# Altium PCB OmniCore_SDR.PcbDoc (part 11 of 13)
Units mil, origin at the board's own origin, x right, y up, seen from the top; angles counter-clockwise.
Board outline 4724.72 x 2755.91 mil, 8 copper layers (Top, GND 1, Layer 1, Layer 2, GND 2, Layer 3, Power, Bottom), stack 40.468 mil thick; 530 components, 427 nets, 2315 pads, 1715 vias.
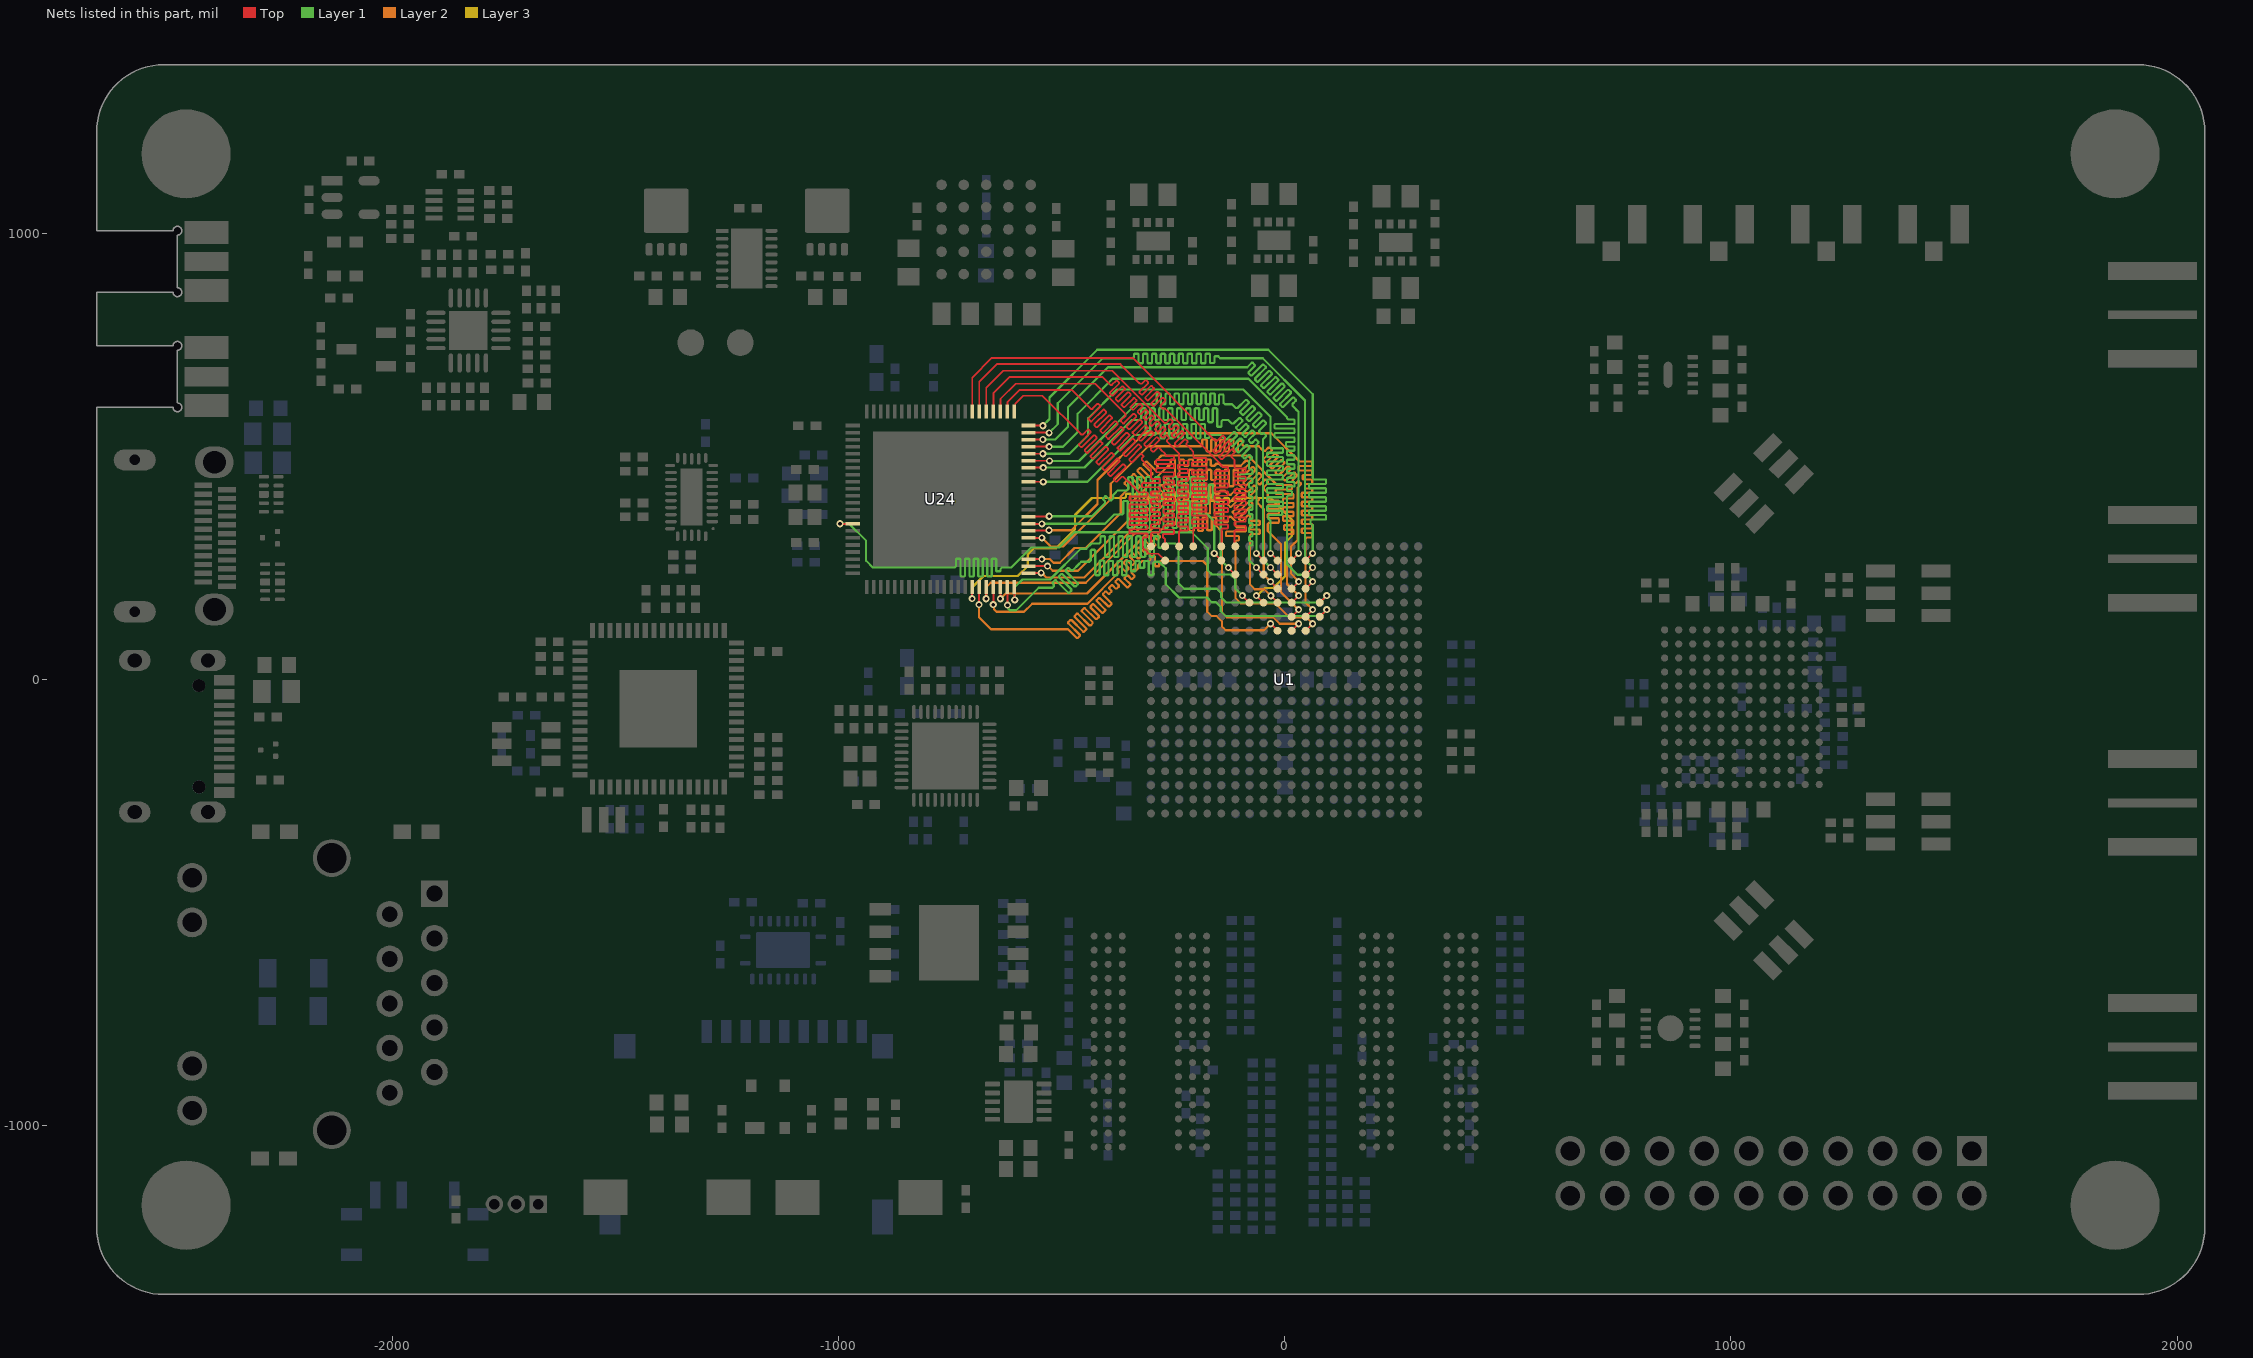
[diagram p16: the nets of this part, all layers, seen from the top]

## Via types
v1: diameter 16, hole 8, Top to Bottom, tented both sides, 1667 vias
v2: diameter 19.68, hole 7.87, Top to Bottom, 44 vias
v3: diameter 200, hole 125, Top to Bottom, 4 vias

## Nets (pads, with @x,y where several pads share a name; then routed paths per layer and width w, separated by ;. In a path a pad name is that pad's centre, name@x,y a point inside that pad or via, vN(x,y) a via of type N, cw(c..) or ccw(c..) an arc to the next point about the centre after c; other vN are vias at no path point) (continued)
UHSIF_CLK: U1.H16 U24.15 | length 1508
  Top w4.2: v1(-996.52,349.27) -996.15,348.9 U24.15@-967.9,348.9 ; v1(-94.73,188.19) U1.H16@-78.98,172.44
  Layer 1 w5: v1(-996.52,349.27) -976.27,349.27 -938,311 -938,266 -923,251 -774,251 -742,251 -739.5,251 -736.57,253.93 -736.57,269.5 -735.07,271 -728.07,271 -726.57,269.5 -726.57,232.5 -725.07,231 -718.07,231 -716.57,232.5 -716.57,269.5 -715.07,271 -708.07,271 -706.57,269.5 -706.57,232.5 -705.07,231 -698.07,231 -696.57,232.5 -696.57,269.5 -695.07,271 -688.07,271 -686.57,269.5 -686.57,232.5 -685.07,231 -678.07,231 -676.57,232.5 -676.57,269.5 -675.07,271 -668.07,271 -666.57,269.5 -666.57,232.5 -665.07,231 -658.07,231 -656.57,232.5 -656.57,269.5 -655.07,271 -648.07,271 -646.57,269.5 -646.57,244.04 -645.07,242.54 -638.07,242.54 -636.57,244.04 -636.57,248.07 -633.64,251 -622,251 -613,251 -568,296 -505,296 -471,330 -208,330 -172.22,294.22 -172.22,245.18 -162.64,235.59 -121.59,235.59 -110.59,224.59 -110.59,204.04 v1(-94.73,188.19)
UHSIF_CS#: U1.J16 U24.38 | length 1463.7
  Top w4.2: v1(-700.6,181.4) -700.4,181.6 -700.4,207 U24.38@-700.2,207.2 ; v1(-63.24,188.19) U1.J16@-47.49,172.44
  Layer 3 w5: v1(-700.6,181.4) -700.6,206.4 -675,232 -598,232 -576,254 -576,280.07 -562.01,294.07 -512.93,294.07 -470,337 -470,369 -432,407 -361,407 -358.5,407 -355.57,409.93 -355.57,415 -354.07,416.5 -347.07,416.5 -345.57,415 -345.57,401.5 -344.07,400 -337.07,400 -335.57,401.5 -335.57,415 -334.07,416.5 -327.07,416.5 -325.57,415 -325.57,401.5 -324.07,400 -317.07,400 -315.57,401.5 -315.57,415 -314.07,416.5 -307.07,416.5 -305.57,415 -305.57,401.5 -304.07,400 -297.07,400 -295.57,401.5 -295.57,415 -294.07,416.5 -287.07,416.5 -285.57,415 -285.57,401.5 -284.07,400 -277.07,400 -275.57,401.5 -275.57,415 -274.07,416.5 -267.07,416.5 -265.57,415 -265.57,401.5 -264.07,400 -257.07,400 -255.57,401.5 -255.57,415 -254.07,416.5 -247.07,416.5 -245.57,415 -245.57,401.5 -244.07,400 -237.07,400 -235.57,401.5 -235.57,415 -234.07,416.5 -227.07,416.5 -225.57,415 -225.57,401.5 -224.07,400 -217.07,400 -215.57,401.5 -215.57,415 -214.07,416.5 -207.07,416.5 -205.57,415 -205.57,401.5 -204.07,400 -197.07,400 -195.57,401.5 -195.57,415 -194.07,416.5 -187.07,416.5 -185.57,415 -185.57,401.5 -184.07,400 -177.07,400 -175.57,401.5 -175.57,415 -174.07,416.5 -167.07,416.5 -165.57,415 -165.57,401.5 -164.07,400 -157.07,400 -155.57,401.5 -155.57,405.91 -154.07,407.41 -147.07,407.41 -145.57,405.91 -145.57,401.5 -144.07,400 -137.07,400 -135.57,401.5 -135.57,405.51 -134.07,407.01 -127.07,407.01 -125.57,405.51 -125.57,401.5 -124.07,400 -117.07,400 -115.57,401.5 -115.57,405.51 -114.07,407.01 -107.07,407.01 -105.57,405.51 -105.57,402.73 -104.07,401.23 -97.07,401.23 -95.57,402.73 -95.57,404.07 -92.64,407 -41,407 -32,407 16,359 16,321.5 1,306.5 1,231.92 -25.73,205.18 -44.77,205.18 -61.76,188.19 v1(-63.24,188.19)
UHSIF_DATA0: U1.K14 U24.39 | length 1500.3
  Top w4.2: v1(-685,168) -684.7,168.3 -684.7,206.9 U24.39@-684.4,207.2 ; v1(-31.74,125.2) U1.K14@-15.99,109.45
  Layer 2 w5: v1(-685,168) -685,140 -658,113 -497,113 -485.66,113 -465.76,93.09 -463.64,93.09 -458.69,98.04 -458.69,100.16 -484.85,126.33 -484.85,128.45 -479.9,133.4 -477.78,133.4 -451.61,107.24 -449.49,107.24 -444.54,112.18 -444.54,114.31 -470.71,140.47 -470.71,142.59 -465.76,147.54 -463.64,147.54 -437.47,121.38 -435.35,121.38 -430.4,126.33 -430.4,128.45 -454.82,152.87 -454.82,154.99 -449.87,159.94 -447.75,159.94 -423.33,135.52 -421.21,135.52 -416.26,140.47 -416.26,142.59 -435.41,161.74 -435.41,163.86 -430.46,168.81 -428.34,168.81 -409.19,149.66 -407.07,149.66 -402.12,154.61 -402.12,156.73 -421.27,175.88 -421.27,178 -416.32,182.95 -414.2,182.95 -395.05,163.8 -392.92,163.8 -387.97,168.75 -387.97,170.87 -407.13,190.03 -407.13,192.15 -402.18,197.1 -400.05,197.1 -395.05,192.09 -392.92,192.09 -387.97,197.04 -387.97,199.16 -392.98,204.17 -392.98,206.29 -388.03,211.24 -385.91,211.24 -378.49,203.82 -376.37,203.82 -371.42,208.77 -371.42,210.89 -378.84,218.31 -378.84,220.43 -373.89,225.38 -371.77,225.38 -353.34,206.95 -351.22,206.95 -346.27,211.9 -346.27,214.02 -358.33,226.09 -358.33,228.21 -353.38,233.16 -351.26,233.16 -343.63,225.53 -341.51,225.53 -336.56,230.48 -336.56,232.6 -343.43,239.46 -343.43,241.59 -338.48,246.53 -336.36,246.53 -334.72,244.9 -332.6,244.9 -327.65,249.85 -327.65,251.97 -328.27,252.6 -328.27,256.74 -326.51,258.51 -319.44,265.57 -306.33,265.57 -303.83,265.57 -300.9,268.5 -300.9,275.66 -299.4,277.16 -292.4,277.16 -290.9,275.66 -290.9,255.55 -289.4,254.05 -282.4,254.05 -280.9,255.55 -280.9,262.65 -277.97,265.57 -223,265.57 -183.21,265.57 -173.47,255.83 -173.47,151.93 -163.73,142.19 -152.19,142.19 -140.73,130.73 -140.73,119.19 -132.23,110.7 -46.24,110.7 v1(-31.74,125.2)
UHSIF_DATA1: U1.K16 U24.40 | length 1500
  Top w4.2: v1(-669,181) -668.85,181.15 -668.85,207.05 U24.40@-668.7,207.2 ; v1(-31,188) -31,187.72 -15.99,172.72 U1.K16@-15.99,172.44
  Layer 2 w5: v1(-669,181) -669,207 -659,217 -446,217 -240,423 -232,423 -229.5,423 -226.57,425.93 -226.57,436.5 -225.07,438 -218.07,438 -216.57,436.5 -216.57,413.45 -215.07,411.95 -208.07,411.95 -206.57,413.45 -206.57,436.5 -205.07,438 -198.07,438 -196.57,436.5 -196.57,413.45 -195.07,411.95 -188.07,411.95 -186.57,413.45 -186.57,436.5 -185.07,438 -178.07,438 -176.57,436.5 -176.57,413.45 -175.07,411.95 -168.07,411.95 -166.57,413.45 -166.57,436.5 -165.07,438 -158.07,438 -156.57,436.5 -156.57,417.79 -155.07,416.29 -148.07,416.29 -146.57,417.79 -146.57,420.07 -143.64,423 -134,423 -131.46,420.46 -127,416 -125.23,414.23 -121.09,414.23 -107.59,427.74 -105.46,427.74 -100.51,422.79 -100.51,420.67 -127.07,394.11 -127.07,391.99 -122.12,387.04 -120,387.04 -93.44,413.59 -91.32,413.59 -86.37,408.64 -86.37,406.52 -116.52,376.37 -116.52,374.25 -111.57,369.3 -109.45,369.3 -79.3,399.45 -77.18,399.45 -72.23,394.5 -72.23,392.38 -102.42,362.19 -102.42,360.07 -97.47,355.12 -95.35,355.12 -82.81,367.66 -78.66,367.66 -78.43,367.43 -78,367 -78,364.32 -78,361.63 -78,359.13 -75.07,356.2 -57.5,356.2 -56,354.7 -56,347.7 -57.5,346.2 -76.5,346.2 -78,344.7 -78,337.7 -76.5,336.2 -57.5,336.2 -56,334.7 -56,327.7 -57.5,326.2 -75.07,326.2 -78,323.27 -78,307 -78,213.68 -67.01,202.69 -45.69,202.69 v1(-31,188)
UHSIF_DATA2: U1.L14 U24.41 | length 1499.7
  Top w4.2: v1(-653,168) v1(-653,168) -652.95,207.15 U24.41@-652.9,207.2 ; U1.L14@15.5,109.45 v1(31.25,125.2)
  Layer 2 w5: v1(-653,168) -651.54,166.54 -651.54,157.54 -646,152 -584,152 -566,170 -442,170 -374,238 -372.23,239.77 -372.23,243.91 -374.74,246.41 -374.74,248.54 -369.79,253.49 -367.67,253.49 -357.02,242.84 -354.9,242.84 -349.95,247.79 -349.95,249.91 -360.59,260.56 -360.59,262.68 -355.64,267.63 -353.52,267.63 -342.88,256.98 -340.76,256.98 -335.81,261.93 -335.81,264.05 -346.45,274.7 -346.45,276.82 -341.5,281.77 -339.38,281.77 -328.74,271.13 -326.61,271.13 -321.67,276.07 -321.67,278.2 -332.31,288.84 -332.31,290.96 -327.36,295.91 -325.24,295.91 -311.12,281.79 -309,281.79 -304.05,286.74 -304.05,288.86 -318.17,302.98 -318.17,305.1 -313.22,310.05 -311.1,310.05 -296.98,295.93 -294.85,295.93 -289.9,300.88 -289.9,303 -304.03,317.12 -304.03,319.25 -299.08,324.2 -296.95,324.2 -286.59,313.83 -284.46,313.83 -279.51,318.78 -279.51,320.9 -283.24,324.62 -283.24,328.76 -271.5,340.5 -264,348 -249,348 -246.5,348 -243.57,350.93 -243.57,361.5 -242.07,363 -235.07,363 -233.57,361.5 -233.57,334.5 -232.07,333 -225.07,333 -223.57,334.5 -223.57,361.5 -222.07,363 -215.07,363 -213.57,361.5 -213.57,334.5 -212.07,333 -205.07,333 -203.57,334.5 -203.57,361.5 -202.07,363 -195.07,363 -193.57,361.5 -193.57,334.5 -192.07,333 -185.07,333 -183.57,334.5 -183.57,361.5 -182.07,363 -175.07,363 -173.57,361.5 -173.57,336 -172.07,334.5 -165.07,334.5 -163.57,336 -163.57,361.5 -162.07,363 -155.07,363 -153.57,361.5 -153.57,344.57 -142.04,333.04 -140.73,331.73 -140.73,150.69 -129.74,139.7 -25.73,139.7 -11.23,125.2 v1(31.25,125.2)
UHSIF_DATA3: U1.M14 U24.42 | length 1499.7
  Top w4.2: U24.42@-637.2,207.2 -637.1,207.1 -637.1,181.1 v1(-637,181) ; U1.M14@47,109.45 v1(62.75,125.2)
  Layer 2 w5: v1(-637,181) -625,193 -443,193 -258,378 -252.56,378 -250.06,378 -247.13,380.93 -247.13,401.5 -245.63,403 -238.63,403 -237.13,401.5 -237.13,373.5 -235.63,372 -228.63,372 -227.13,373.5 -227.13,401.5 -225.63,403 -218.63,403 -217.13,401.5 -217.13,373.5 -215.63,372 -208.63,372 -207.13,373.5 -207.13,401.5 -205.63,403 -198.63,403 -197.13,401.5 -197.13,373.5 -195.63,372 -188.63,372 -187.13,373.5 -187.13,401.5 -185.63,403 -178.63,403 -177.13,401.5 -177.13,373.5 -175.63,372 -168.63,372 -167.13,373.5 -167.13,401.5 -165.63,403 -158.63,403 -157.13,401.5 -157.13,373.5 -155.63,372 -148.63,372 -147.13,373.5 -147.13,401.5 -145.63,403 -138.63,403 -137.13,401.5 -137.13,354.5 -135.63,353 -128.63,353 -127.13,354.5 -127.13,362.13 -124.2,365.06 -120.06,365.06 -115,360 -110.48,355.48 -110.48,347 -110.48,344.5 -107.55,341.57 -88.5,341.57 -87,340.07 -87,333.07 -88.5,331.57 -130.23,331.57 -131.73,330.07 -131.73,323.07 -130.23,321.57 -103.8,321.57 -102.3,320.07 -102.3,313.07 -103.8,311.57 -107.55,311.57 -110.48,308.64 -110.48,299.82 -110.48,183.43 -98.24,171.19 -21.19,171.19 10.3,139.7 48.25,139.7 v1(62.75,125.2)
UHSIF_DATA4: U1.N15 U24.43 | length 1508.7
  Top w4.2: U24.43@-621.4,207.2 -621.2,207 -621.2,166.87 v1(-621.24,166.83) ; U1.N15@78.5,140.94 v1(94.24,156.69)
  Layer 1 w5: v1(-621.24,166.83) -619.14,164.72 -619.14,158.35 -615.97,155.18 -601.82,155.18 -551,206 -524,206 -520.46,206 -517.53,208.93 -517.53,213.07 -519.92,215.46 -519.92,217.58 -514.97,222.53 -512.85,222.53 -485.01,194.69 -482.89,194.69 -477.94,199.64 -477.94,201.76 -505.78,229.6 -505.78,231.72 -500.83,236.67 -498.71,236.67 -470.87,208.83 -468.74,208.83 -463.8,213.78 -463.8,215.9 -491.02,243.12 -491.02,245.24 -486.07,250.19 -483.95,250.19 -478.95,245.19 -474.81,245.19 -462,258 -456,264 -440,264 -437.5,264 -434.57,266.93 -434.57,289.2 -433.07,290.7 -426.07,290.7 -424.57,289.2 -424.57,235.5 -423.07,234 -416.07,234 -414.57,235.5 -414.57,265.21 -413.07,266.71 -406.07,266.71 -404.57,265.21 -404.57,235.5 -403.07,234 -396.07,234 -394.57,235.5 -394.57,264.5 -393.07,266 -386.07,266 -384.57,264.5 -384.57,235.5 -383.07,234 -376.07,234 -374.57,235.5 -374.57,264.5 -373.07,266 -366.07,266 -364.57,264.5 -364.57,235.5 -363.07,234 -356.07,234 -354.57,235.5 -354.57,264.5 -353.07,266 -346.07,266 -344.57,264.5 -344.57,244.44 -343.07,242.94 -336.07,242.94 -334.57,244.44 -334.57,264.5 -333.07,266 -326.07,266 -324.57,264.5 -324.57,252 -323.07,250.5 -316.07,250.5 -314.57,252 -314.57,264.5 -313.07,266 -306.07,266 -304.57,264.5 -304.57,235.5 -303.07,234 -296.07,234 -294.57,235.5 -294.57,261.07 -291.64,264 -281,264 -276,259 -266.71,249.71 -266.71,213.68 -237.03,184 -174.04,184 -163.54,173.5 -154.03,173.5 -143.13,162.6 -143.13,153.09 -132.23,142.19 79.74,142.19 v1(94.24,156.69)
UHSIF_DATA5: U1.N16 U24.44 | length 1508.2
  Top w4.2: U24.44@-605.7,207.2 -605.35,206.85 -605.35,178.85 v1(-605,178.5) ; U1.N16@78.5,172.44 v1(94.24,188.19)
  Layer 1 w5: v1(-605,178.5) -605,207 -587.5,224.5 -525.73,224.5 -456.8,293.43 -444.57,293.43 -433,305 -418,305 -415.5,305 -412.57,307.93 -412.57,319.5 -411.07,321 -404.07,321 -402.57,319.5 -402.57,276.5 -401.07,275 -394.07,275 -392.57,276.5 -392.57,319.5 -391.07,321 -384.07,321 -382.57,319.5 -382.57,276.5 -381.07,275 -374.07,275 -372.57,276.5 -372.57,319.5 -371.07,321 -364.07,321 -362.57,319.5 -362.57,276.5 -361.07,275 -354.07,275 -352.57,276.5 -352.57,319.5 -351.07,321 -344.07,321 -342.57,319.5 -342.57,276.5 -341.07,275 -334.07,275 -332.57,276.5 -332.57,319.5 -331.07,321 -324.07,321 -322.57,319.5 -322.57,276.5 -321.07,275 -314.07,275 -312.57,276.5 -312.57,319.5 -311.07,321 -304.07,321 -302.57,319.5 -302.57,276.5 -301.07,275 -294.07,275 -292.57,276.5 -292.57,319.5 -291.07,321 -284.07,321 -282.57,319.5 -282.57,297.05 -281.07,295.55 -274.07,295.55 -272.57,297.05 -272.57,302.07 -269.64,305 -250,305 -246,305 -237.71,296.71 -237.71,216.18 -225,203.47 -152.5,203.47 -142.37,193.34 -142.37,183.82 -131.56,173.02 79.07,173.02 v1(94.24,188.19)
UHSIF_DATA6: U1.K17 U24.45 | length 1499.7
  Top w4.2: U24.45@-574.2,238.6 -574,238.8 -546.2,238.8 v1(-546,239) ; v1(-31.74,219.68) U1.K17@-15.99,203.94
  Layer 2 w5: v1(-546,239) -544.08,239 -534.08,229 -449,229 -326,352 -324.23,353.77 -324.23,357.91 -337.91,371.59 -337.91,373.71 -332.96,378.66 -330.84,378.66 -315.01,362.83 -312.89,362.83 -307.94,367.78 -307.94,369.91 -324.64,386.6 -324.64,388.72 -319.69,393.67 -317.56,393.67 -300.87,376.98 -298.75,376.98 -293.8,381.93 -293.8,384.05 -310.49,400.74 -310.49,402.86 -305.54,407.81 -303.42,407.81 -286.73,391.12 -284.61,391.12 -279.66,396.07 -279.66,398.19 -296.35,414.88 -296.35,417 -291.4,421.95 -289.28,421.95 -272.59,405.26 -270.47,405.26 -265.52,410.21 -265.52,412.33 -282.21,429.02 -282.21,431.15 -277.26,436.1 -275.14,436.1 -258.45,419.4 -256.32,419.4 -251.37,424.35 -251.37,426.47 -268.07,443.17 -268.07,445.29 -263.12,450.24 -261,450.24 -246.45,435.69 -242.31,435.69 -240,438 -231,447 -220,447 -217.5,447 -214.57,449.93 -214.57,468.5 -213.07,470 -206.07,470 -204.57,468.5 -204.57,448.5 -203.07,447 -196.07,447 -194.57,448.5 -194.57,468.5 -193.07,470 -186.07,470 -184.57,468.5 -184.57,448.5 -183.07,447 -176.07,447 -174.57,448.5 -174.57,468.5 -173.07,470 -166.07,470 -164.57,468.5 -164.57,448.5 -163.07,447 -156.07,447 -154.57,448.5 -154.57,468.5 -153.07,470 -146.07,470 -144.57,468.5 -144.57,433.5 -143.07,432 -136.07,432 -134.57,433.5 -134.57,468.5 -133.07,470 -126.07,470 -124.57,468.5 -124.57,434.98 -123.07,433.48 -116.07,433.48 -114.57,434.98 -114.57,468.5 -113.07,470 -106.07,470 -104.57,468.5 -104.57,439.57 -88,423 -86.23,421.23 -82.09,421.23 -69.09,434.24 -66.96,434.24 -62.01,429.29 -62.01,427.17 -76.03,413.15 -76.03,411.03 -71.08,406.08 -68.96,406.08 -65.43,409.61 -63.31,409.61 -58.36,404.66 -58.36,402.53 -60.88,400.02 -60.88,395.88 -54.77,389.77 -53,388 -47,382 -47,234.94 v1(-31.74,219.68)
UHSIF_DATA7: U1.L15 U24.46 | length 1499.7
  Top w4.2: U24.46@-574.2,254.4 v1@-531.5,254.37 ; U1.L15@15.5,140.98 v1(31.22,156.73)
  Layer 2 w5: v1(-531.48,254.35) -530.25,254.35 -519.9,244 -463,244 -347.97,359.03 -347.97,392.03 -261,479 -258.5,479 -255.57,481.93 -255.57,491.5 -254.07,493 -247.07,493 -245.57,491.5 -245.57,456.25 -244.07,454.75 -237.07,454.75 -235.57,456.25 -235.57,491.5 -234.07,493 -227.07,493 -225.57,491.5 -225.57,480.15 -224.07,478.65 -217.07,478.65 -215.57,480.15 -215.57,491.5 -214.07,493 -207.07,493 -205.57,491.5 -205.57,480.49 -204.07,478.99 -197.07,478.99 -195.57,480.49 -195.57,491.5 -194.07,493 -187.07,493 -185.57,491.5 -185.57,480.49 -184.07,478.99 -177.07,478.99 -175.57,480.49 -175.57,491.5 -174.07,493 -167.07,493 -165.57,491.5 -165.57,480.49 -164.07,478.99 -157.07,478.99 -155.57,480.49 -155.57,482.24 -154.07,483.74 -147.07,483.74 -145.57,482.24 -145.57,481.93 -142.64,479 -129.9,479 -106,479 -98.32,479 -86.59,490.74 -84.46,490.74 -79.51,485.79 -79.51,483.66 -94.51,468.67 -94.51,466.55 -89.56,461.6 -87.44,461.6 -72.44,476.59 -70.32,476.59 -65.37,471.64 -65.37,469.52 -92.52,442.37 -92.52,440.25 -87.57,435.3 -85.45,435.3 -58.3,462.45 -56.18,462.45 -51.23,457.5 -51.23,455.38 -62.24,444.37 -62.24,442.24 -57.3,437.3 -55.17,437.3 -44.16,448.31 -42.04,448.31 -37.09,443.36 -37.09,441.24 -47.09,431.23 -47.09,427.09 -45.27,425.27 -43.5,423.5 -38,418 -38,407 -38,404.5 -35.07,401.57 -14.5,401.57 -13,400.07 -13,393.07 -14.5,391.57 -36.5,391.57 -38,390.07 -38,383.07 -36.5,381.57 -14.5,381.57 -13,380.07 -13,373.07 -14.5,371.57 -36.5,371.57 -38,370.07 -38,363.07 -36.5,361.57 -14.5,361.57 -13,360.07 -13,353.07 -14.5,351.57 -35.07,351.57 -38,348.64 -38,342.78 -38,333 -8,303 -8,195.94 v1(31.22,156.73)
UHSIF_DATA8: U1.L16 U24.47 | length 1499.7
  Top w4.2: U24.47@-574.2,270.1 -574.12,270.02 -544.08,270.02 v1(-544,269.94) ; U1.L16@15.5,172.44 v1(31.25,188.19)
  Layer 2 w5: v1(-544,269.94) -525.98,269.94 -518.04,262 -504,262 -471,295 -446,295 -367.5,373.5 -367.5,410.5 -352.5,425.5 -350.73,427.27 -350.73,431.41 -358.21,438.88 -358.21,441.01 -353.26,445.96 -351.14,445.96 -332.04,426.86 -329.92,426.86 -324.97,431.81 -324.97,433.94 -344.06,453.03 -344.06,455.15 -339.11,460.1 -336.99,460.1 -317.9,441.01 -315.78,441.01 -310.83,445.96 -310.83,448.08 -329.92,467.17 -329.92,469.29 -324.97,474.24 -322.85,474.24 -303.76,455.15 -301.64,455.15 -296.69,460.1 -296.69,462.22 -315.78,481.31 -315.78,483.43 -310.83,488.38 -308.71,488.38 -290.77,470.44 -288.65,470.44 -283.7,475.39 -283.7,477.51 -290.02,483.84 -290.02,487.98 -285.5,492.5 -276,502 -83,502 -19.5,438.5 -17,436 14.77,436 16.27,434.5 16.27,427.5 14.77,426 -18.5,426 -20,424.5 -20,417.5 -18.5,416 18.5,416 20,414.5 20,407.5 18.5,406 -2.5,406 -4,404.5 -4,397.5 -2.5,396 18.5,396 20,394.5 20,387.5 18.5,386 -2.5,386 -4,384.5 -4,377.5 -2.5,376 18.5,376 20,374.5 20,367.5 18.5,366 -2.5,366 -4,364.5 -4,357.5 -2.5,356 18.5,356 20,354.5 20,347.5 18.5,346 0,346 -1.5,344.5 -1.5,337.5 0,336 18.5,336 20,334.5 20,327.5 18.5,326 7.93,326 5,323.07 5,314.22 5,214.44 v1(31.25,188.19)
UHSIF_DATA9: U1.L17 U24.50 | length 1499.7
  Top w4.2: U24.50@-574.2,317.4 -574.1,317.5 -544.1,317.5 v1(-544,317.6) ; U1.L17@15.5,203.94 v1(31.25,219.68)
  Layer 2 w5: v1(-544,317.6) -524.9,298.5 -495.5,298.5 -390,404 -390,439 -306,523 -190,523 -187.5,523 -184.57,525.93 -184.57,536.5 -183.07,538 -176.07,538 -174.57,536.5 -174.57,512.5 -173.07,511 -166.07,511 -164.57,512.5 -164.57,536.5 -163.07,538 -156.07,538 -154.57,536.5 -154.57,512.5 -153.07,511 -146.07,511 -144.57,512.5 -144.57,536.5 -143.07,538 -136.07,538 -134.57,536.5 -134.57,512.5 -133.07,511 -126.07,511 -124.57,512.5 -124.57,536.5 -123.07,538 -116.07,538 -114.57,536.5 -114.57,512.5 -113.07,511 -106.07,511 -104.57,512.5 -104.57,533.99 -103.07,535.49 -96.07,535.49 -94.57,533.99 -94.57,525.93 -91.64,523 -67,523 -58,523 -49.5,514.5 -47.73,512.73 -43.59,512.73 -36.11,520.21 -33.99,520.21 -29.04,515.26 -29.04,513.14 -48.14,494.04 -48.14,491.92 -43.19,486.97 -41.06,486.97 -21.97,506.06 -19.85,506.06 -14.9,501.11 -14.9,498.99 -33.99,479.9 -33.99,477.78 -29.04,472.83 -26.92,472.83 -7.83,491.92 -5.71,491.92 -0.76,486.97 -0.76,484.85 -19.85,465.76 -19.85,463.64 -14.9,458.69 -12.78,458.69 6.31,477.78 8.43,477.78 13.38,472.83 13.38,470.71 -4.2,453.13 -4.2,451.01 0.75,446.06 2.88,446.06 20.45,463.64 22.58,463.64 27.52,458.69 27.52,456.57 18.29,447.33 18.29,445.21 23.24,440.26 25.36,440.26 29.62,444.52 31.74,444.52 36.69,439.57 36.69,437.45 29,429.76 29,424 29,313 14,298 14,236.94 v1(31.25,219.68)
UHSIF_DATA10: U1.M15 U24.51 | length 1500
  Top w4.2: U24.51@-574.2,333.1 -573.38,333.92 -528.92,333.92 v1(-528.1,334.73) ; U1.M15@47,140.94 v1(62.75,156.69)
  Layer 2 w5: v1(-528.1,334.73) -478.27,334.73 -419.5,393.5 -419.5,447.5 -315,552 -30,552 31,491 33.5,488.5 60.25,488.5 61.75,487 61.75,480 60.25,478.5 33.25,478.5 31.75,477 31.75,470 33.25,468.5 60.25,468.5 61.75,467 61.75,460 60.25,458.5 41.99,458.5 40.49,457 40.49,450 41.99,448.5 60.25,448.5 61.75,447 61.75,440 60.25,438.5 47.19,438.5 45.69,437 45.69,430 47.19,428.5 60.25,428.5 61.75,427 61.75,420 60.25,418.5 39.5,418.5 38,417 38,410 39.5,408.5 60.25,408.5 61.75,407 61.75,400 60.25,398.5 39.5,398.5 38,397 38,390 39.5,388.5 60.25,388.5 61.75,387 61.75,380 60.25,378.5 39.5,378.5 38,377 38,370 39.5,368.5 60.25,368.5 61.75,367 61.75,360 60.25,358.5 39.5,358.5 38,357 38,350 39.5,348.5 60.25,348.5 61.75,347 61.75,340 60.25,338.5 39.5,338.5 38,337 38,330 39.5,328.5 59.83,328.5 61.33,327 61.33,320 59.83,318.5 49.68,318.5 46.75,315.57 46.75,301 46.75,172.69 v1(62.75,156.69)
UHSIF_DATA11: U1.F19 U24.52 | length 1508.1
  Top w4.2: U24.52@-574.2,348.9 -574.15,348.95 v1(-544,349) v1(-544,349) ; v1(-157.72,282.68) U1.F19@-141.98,266.93
  Layer 1 w5: v1(-544,349) -543.77,349.23 -522,349.23 -402.77,349.23 -396.57,355.43 -382,370 -367,370 -364.5,370 -361.57,372.93 -361.57,398.5 -360.07,400 -353.07,400 -351.57,398.5 -351.57,341.5 -350.07,340 -343.07,340 -341.57,341.5 -341.57,398.5 -340.07,400 -333.07,400 -331.57,398.5 -331.57,341.5 -330.07,340 -323.07,340 -321.57,341.5 -321.57,398.5 -320.07,400 -313.07,400 -311.57,398.5 -311.57,341.5 -310.07,340 -303.07,340 -301.57,341.5 -301.57,398.5 -300.07,400 -293.07,400 -291.57,398.5 -291.57,341.5 -290.07,340 -283.07,340 -281.57,341.5 -281.57,398.5 -280.07,400 -273.07,400 -271.57,398.5 -271.57,341.5 -270.07,340 -263.07,340 -261.57,341.5 -261.57,398.5 -260.07,400 -253.07,400 -251.57,398.5 -251.57,341.5 -250.07,340 -243.07,340 -241.57,341.5 -241.57,398.5 -240.07,400 -233.07,400 -231.57,398.5 -231.57,341.5 -230.07,340 -223.07,340 -221.57,341.5 -221.57,398.5 -220.07,400 -213.07,400 -211.57,398.5 -211.57,341.5 -210.07,340 -203.07,340 -201.57,341.5 -201.57,396.25 -200.07,397.75 -193.07,397.75 -191.57,396.25 -191.57,372.93 -188.64,370 -173,370 -158,355 -158,282.95 v1(-157.72,282.68)
UHSIF_DATA12: U1.G18 U24.53 | length 1508.3
  Top w4.2: U24.53@-574.2,364.6 -573.5,365.3 -528.7,365.3 v1(-528,366) ; v1(-126.23,251.07) v1(-126.23,251.07) U1.G18@-110.48,235.43 U1.G18@-110.48,235.43
  Layer 1 w5: v1(-528,366) -432,366 -404.5,393.5 -402.73,395.27 -402.73,399.41 -407.24,403.91 -407.24,406.04 -402.29,410.99 -400.17,410.99 -390.77,401.59 -388.65,401.59 -383.7,406.54 -383.7,408.66 -384.45,409.41 -384.45,413.55 -381,417 -374,424 -356,424 -353.5,424 -350.57,426.93 -350.57,452.5 -349.07,454 -342.07,454 -340.57,452.5 -340.57,410.5 -339.07,409 -332.07,409 -330.57,410.5 -330.57,452.5 -329.07,454 -322.07,454 -320.57,452.5 -320.57,410.5 -319.07,409 -312.07,409 -310.57,410.5 -310.57,452.5 -309.07,454 -302.07,454 -300.57,452.5 -300.57,410.5 -299.07,409 -292.07,409 -290.57,410.5 -290.57,452.5 -289.07,454 -282.07,454 -280.57,452.5 -280.57,410.5 -279.07,409 -272.07,409 -270.57,410.5 -270.57,452.5 -269.07,454 -262.07,454 -260.57,452.5 -260.57,410.5 -259.07,409 -252.07,409 -250.57,410.5 -250.57,452.5 -249.07,454 -242.07,454 -240.57,452.5 -240.57,410.5 -239.07,409 -232.07,409 -230.57,410.5 -230.57,452.5 -229.07,454 -222.07,454 -220.57,452.5 -220.57,410.5 -219.07,409 -212.07,409 -210.57,410.5 -210.57,452.5 -209.07,454 -202.07,454 -200.57,452.5 -200.57,408.25 -199.07,406.75 -192.07,406.75 -190.57,408.25 -190.57,452.5 -189.07,454 -182.07,454 -180.57,452.5 -180.57,395.5 -179.07,394 -172.07,394 -170.57,395.5 -170.57,435.34 -169.07,436.84 -162.07,436.84 -160.57,435.34 -160.57,407.57 -144.8,391.8 -143.22,390.22 -143.22,268.18 -126.23,251.18 v1(-126.23,251.07)
UHSIF_DATA13: U1.J18 U24.58 | length 1508.1
  Top w4.2: U24.58@-574.2,443.4 -574.07,443.28 -541.12,443.28 v1(-541,443.15) ; v1(-63.5,251.18) -63.37,251.18 -47.62,235.43 U1.J18@-47.49,235.43
  Layer 1 w5: v1(-541,443.15) -441.85,443.15 -337,548 -294,548 -291.5,548 -288.57,550.93 -288.57,571.5 -287.07,573 -280.07,573 -278.57,571.5 -278.57,542.5 -277.07,541 -270.07,541 -268.57,542.5 -268.57,571.5 -267.07,573 -260.07,573 -258.57,571.5 -258.57,542.5 -257.07,541 -250.07,541 -248.57,542.5 -248.57,571.5 -247.07,573 -240.07,573 -238.57,571.5 -238.57,542.5 -237.07,541 -230.07,541 -228.57,542.5 -228.57,571.5 -227.07,573 -220.07,573 -218.57,571.5 -218.57,542.5 -217.07,541 -210.07,541 -208.57,542.5 -208.57,571.5 -207.07,573 -200.07,573 -198.57,571.5 -198.57,542.05 -197.07,540.55 -190.07,540.55 -188.57,542.05 -188.57,571.5 -187.07,573 -180.07,573 -178.57,571.5 -178.57,542.75 -177.07,541.25 -170.07,541.25 -168.57,542.75 -168.57,545.07 -165.64,548 -155,548 -143,548 -135.5,540.5 -133.73,538.73 -129.59,538.73 -114.09,554.24 -111.96,554.24 -107.01,549.29 -107.01,547.17 -123.53,530.65 -123.53,528.53 -118.58,523.58 -116.46,523.58 -99.94,540.09 -97.82,540.09 -92.87,535.14 -92.87,533.02 -109.39,516.51 -109.39,514.39 -104.44,509.44 -102.32,509.44 -85.8,525.95 -83.68,525.95 -78.73,521 -78.73,518.88 -95.24,502.37 -95.24,500.24 -90.3,495.3 -88.17,495.3 -80.37,503.1 -78.25,503.1 -73.3,498.15 -73.3,496.03 -80.23,489.09 -80.23,480.62 -80.23,476 -80.23,473.5 -77.3,470.57 -73.74,470.57 -72.24,469.07 -72.24,462.07 -73.74,460.57 -98.73,460.57 -100.23,459.07 -100.23,452.07 -98.73,450.57 -73.74,450.57 -72.24,449.07 -72.24,442.07 -73.74,440.57 -78.73,440.57 -80.23,439.07 -80.23,432.07 -78.73,430.57 -73.74,430.57 -72.24,429.07 -72.24,422.07 -73.74,420.57 -78.73,420.57 -80.23,419.07 -80.23,412.07 -78.73,410.57 -73.74,410.57 -72.24,409.07 -72.24,402.07 -73.74,400.57 -78.73,400.57 -80.23,399.07 -80.23,392.07 -78.73,390.57 -73.74,390.57 -72.24,389.07 -72.24,382.07 -73.74,380.57 -78.73,380.57 -80.23,379.07 -80.23,372.07 -78.73,370.57 -73.74,370.57 -72.24,369.07 -72.24,362.07 -73.74,360.57 -78.73,360.57 -80.23,359.07 -80.23,352.07 -78.73,350.57 -73.74,350.57 -72.24,349.07 -72.24,342.07 -73.74,340.57 -78.73,340.57 -80.23,339.07 -80.23,332.07 -78.73,330.57 -73.74,330.57 -72.24,329.07 -72.24,322.07 -73.74,320.57 -78.73,320.57 -80.23,319.07 -80.23,312.07 -78.73,310.57 -73.74,310.57 -72.24,309.07 -72.24,302.07 -73.74,300.57 -77.3,300.57 -80.23,297.64 -80.23,289 -80.23,268.18 -63.5,251.44 v1(-63.5,251.18)
UHSIF_DATA14: U1.J19 U24.60 | length 1508.1
  Top w4.2: U24.60@-574.2,474.9 -574.07,475.03 -541.12,475.03 v1(-541,475.15) ; v1(-63.5,282.68) -63.37,282.68 -47.62,266.93 U1.J19@-47.49,266.93
  Layer 1 w5: v1(-541,475.15) -448.85,475.15 -342,582 -326.75,582 -324.25,582 -321.32,584.93 -321.32,606.5 -319.82,608 -312.82,608 -311.32,606.5 -311.32,558.5 -309.82,557 -302.82,557 -301.32,558.5 -301.32,606.5 -299.82,608 -292.82,608 -291.32,606.5 -291.32,583.5 -289.82,582 -282.82,582 -281.32,583.5 -281.32,606.5 -279.82,608 -272.82,608 -271.32,606.5 -271.32,583.5 -269.82,582 -262.82,582 -261.32,583.5 -261.32,606.5 -259.82,608 -252.82,608 -251.32,606.5 -251.32,583.5 -249.82,582 -242.82,582 -241.32,583.5 -241.32,606.5 -239.82,608 -232.82,608 -231.32,606.5 -231.32,583.5 -229.82,582 -222.82,582 -221.32,583.5 -221.32,606.5 -219.82,608 -212.82,608 -211.32,606.5 -211.32,583.5 -209.82,582 -202.82,582 -201.32,583.5 -201.32,606.5 -199.82,608 -192.82,608 -191.32,606.5 -191.32,583.5 -189.82,582 -182.82,582 -181.32,583.5 -181.32,606.5 -179.82,608 -172.82,608 -171.32,606.5 -171.32,578.33 -169.82,576.83 -162.82,576.83 -161.32,578.33 -161.32,606.5 -159.82,608 -152.82,608 -151.32,606.5 -151.32,567.85 -149.82,566.35 -142.82,566.35 -141.32,567.85 -141.32,579.07 -138.39,582 -127,582 -120.5,575.5 -118.73,573.73 -114.59,573.73 -102.09,586.24 -99.96,586.24 -95.01,581.29 -95.01,579.17 -108.53,565.65 -108.53,563.53 -103.58,558.58 -101.46,558.58 -87.94,572.09 -85.82,572.09 -80.87,567.14 -80.87,565.02 -94.39,551.51 -94.39,549.39 -89.44,544.44 -87.32,544.44 -73.8,557.95 -71.68,557.95 -66.73,553 -66.73,550.88 -80.24,537.37 -80.24,535.24 -75.3,530.29 -73.17,530.29 -65.87,537.6 -63.75,537.6 -58.8,532.65 -58.8,530.53 -65.09,524.23 -65.09,520.09 -63.24,518.24 -63.24,514.37 -63.24,282.94 v1(-63.5,282.68)
UHSIF_DATA15: U1.K18 U24.61 | length 1508.5
  Top w4.2: U24.61@-574.2,490.6 -573.9,490.3 -527.3,490.3 v1(-527,490) ; v1(-31.74,251.18) U1.K18@-15.99,235.43
  Layer 1 w5: v1(-527,490) -461,490 -334,617 -292.35,617 -289.85,617 -286.92,619.93 -286.92,639.5 -285.42,641 -278.42,641 -276.92,639.5 -276.92,618.5 -275.42,617 -268.42,617 -266.92,618.5 -266.92,639.5 -265.42,641 -258.42,641 -256.92,639.5 -256.92,618.5 -255.42,617 -248.42,617 -246.92,618.5 -246.92,639.5 -245.42,641 -238.42,641 -236.92,639.5 -236.92,618.5 -235.42,617 -228.42,617 -226.92,618.5 -226.92,639.5 -225.42,641 -218.42,641 -216.92,639.5 -216.92,618.5 -215.42,617 -208.42,617 -206.92,618.5 -206.92,639.5 -205.42,641 -198.42,641 -196.92,639.5 -196.92,618.5 -195.42,617 -188.42,617 -186.92,618.5 -186.92,639.5 -185.42,641 -178.42,641 -176.92,639.5 -176.92,618.5 -175.42,617 -168.42,617 -166.92,618.5 -166.92,639.5 -165.42,641 -158.42,641 -156.92,639.5 -156.92,618.5 -155.42,617 -148.42,617 -146.92,618.5 -146.92,637.18 -145.42,638.68 -138.42,638.68 -136.92,637.18 -136.92,619.93 -133.99,617 -127,617 -118,617 -111.5,610.5 -109.73,608.73 -105.59,608.73 -87.51,626.81 -85.39,626.81 -80.44,621.86 -80.44,619.74 -99.53,600.65 -99.53,598.53 -94.58,593.58 -92.46,593.58 -73.37,612.67 -71.24,612.67 -66.3,607.72 -66.3,605.6 -85.39,586.51 -85.39,584.39 -80.44,579.44 -78.32,579.44 -59.22,598.53 -57.1,598.53 -52.15,593.58 -52.15,591.46 -71.24,572.37 -71.24,570.24 -66.3,565.29 -64.17,565.29 -48.87,580.6 -46.75,580.6 -41.8,575.65 -41.8,573.53 -57.5,557.83 -57.5,555.71 -52.55,550.76 -50.42,550.76 -48.87,552.31 -46.75,552.31 -41.8,547.36 -41.8,545.24 -48.74,538.31 -48.74,528.28 -48.74,525.78 -48.74,268.18 v1(-31.74,251.18)
UHSIF_DATA16: U1.K19 U24.62 | length 1508.1
  Top w4.2: U24.62@-574.2,506.4 -574,506.2 -542.2,506.2 v1(-542,506) ; v1(-31.74,282.68) U1.K19@-15.99,266.93
  Layer 1 w5: v1(-542,506) -482,506 -440.5,547.5 -440.5,585.5 -376,650 -93,650 -31.74,588.74 -31.74,524 -31.74,521.5 -28.81,518.57 -5.5,518.57 -4,517.07 -4,510.07 -5.5,508.57 -38.24,508.57 -39.74,507.07 -39.74,500.07 -38.24,498.57 -5.5,498.57 -4,497.07 -4,490.07 -5.5,488.57 -38.24,488.57 -39.74,487.07 -39.74,480.07 -38.24,478.57 -5.5,478.57 -4,477.07 -4,470.07 -5.5,468.57 -38.24,468.57 -39.74,467.07 -39.74,460.07 -38.24,458.57 -5.5,458.57 -4,457.07 -4,450.07 -5.5,448.57 -38.24,448.57 -39.74,447.07 -39.74,440.07 -38.24,438.57 -5.5,438.57 -4,437.07 -4,430.07 -5.5,428.57 -38.24,428.57 -39.74,427.07 -39.74,420.07 -38.24,418.57 -5.5,418.57 -4,417.07 -4,410.07 -5.5,408.57 -38.24,408.57 -39.74,407.07 -39.74,400.07 -38.24,398.57 -5.5,398.57 -4,397.07 -4,390.07 -5.5,388.57 -38.24,388.57 -39.74,387.07 -39.74,380.07 -38.24,378.57 -7.11,378.57 -5.61,377.07 -5.61,370.07 -7.11,368.57 -34.67,368.57 -36.17,367.07 -36.17,360.07 -34.67,358.57 -31.74,355.64 -31.74,352 v1(-31.74,282.68)
UHSIF_DATA17: U1.M17 U24.63 | length 1508.1
  Top w4.2: U24.63@-574.2,522.1 -574.15,522.05 v1(-528,522) v1(-528,522) ; U1.M17@47,203.94 v1(62.75,219.68)
  Layer 1 w5: v1(-528,522) -497,522 -464.02,554.98 -464.02,595.98 -386,674 -81,674 5,588 5,585.5 7.93,582.57 20.75,582.57 22.25,581.07 22.25,574.07 20.75,572.57 -21.24,572.57 -22.74,571.07 -22.74,564.07 -21.24,562.57 20.75,562.57 22.25,561.07 22.25,554.07 20.75,552.57 -21.24,552.57 -22.74,551.07 -22.74,544.07 -21.24,542.57 20.75,542.57 22.25,541.07 22.25,534.07 20.75,532.57 4.62,532.57 3.12,531.07 3.12,524.07 4.62,522.57 20.75,522.57 22.25,521.07 22.25,514.07 20.75,512.57 6.5,512.57 5,511.07 5,504.07 6.5,502.57 20.75,502.57 22.25,501.07 22.25,494.07 20.75,492.57 6.5,492.57 5,491.07 5,484.07 6.5,482.57 20.75,482.57 22.25,481.07 22.25,474.07 20.75,472.57 6.5,472.57 5,471.07 5,464.07 6.5,462.57 20.75,462.57 22.25,461.07 22.25,454.07 20.75,452.57 6.5,452.57 5,451.07 5,444.07 6.5,442.57 20.75,442.57 22.25,441.07 22.25,434.07 20.75,432.57 6.5,432.57 5,431.07 5,424.07 6.5,422.57 14.76,422.57 16.26,421.07 16.26,414.07 14.76,412.57 7.93,412.57 5,409.64 5,399.75 5,258.93 28.93,235 49,235 62.75,221.25 v1(62.75,219.68)
UHSIF_DATA18: U1.L19 U24.64 | length 1508.1
  Top w4.2: U24.64@-574.2,537.9 -574.15,537.95 v1(-542,538) v1(-542,538) ; U1.L19@15.5,266.93 v1(31.25,282.68)
  Layer 1 w5: v1(-542,538) -514,538 -485.5,566.5 -485.5,610.5 -396,700 -87.32,700 -83.79,700 -73.85,709.94 -71.72,709.94 -66.77,704.99 -66.77,702.87 -80.9,688.74 -80.9,686.62 -75.95,681.67 -73.83,681.67 -49.68,705.83 -47.55,705.83 -42.6,700.88 -42.6,698.75 -66.75,674.6 -66.75,672.48 -61.81,667.53 -59.68,667.53 -35.53,691.68 -33.41,691.68 -28.46,686.73 -28.46,684.61 -52.61,660.46 -52.61,658.34 -47.66,653.39 -45.54,653.39 -21.39,677.54 -19.27,677.54 -14.32,672.59 -14.32,670.47 -38.47,646.32 -38.47,644.2 -33.52,639.25 -31.4,639.25 -7.25,663.4 -5.13,663.4 -0.18,658.45 -0.18,656.33 -24.33,632.18 -24.33,630.06 -19.38,625.11 -17.26,625.11 6.89,649.26 9.01,649.26 13.96,644.31 13.96,642.19 -10.19,618.04 -10.19,615.91 -5.24,610.96 -3.12,610.96 17.92,632 20.04,632 24.99,627.05 24.99,624.93 17.6,617.54 17.6,613.4 23.73,607.27 25.5,605.5 31.25,599.75 v1(31.25,282.68)
UHSIF_DATA19: U1.M18 U24.65 | length 1508.2
  Top w4.2: U24.65@-574.2,553.6 -573.9,553.3 -528.3,553.3 v1(-528,553) ; U1.M18@47,235.43 v1(62.75,251.18)
  Layer 1 w5: v1(-528,553) -508.5,572.5 -508.5,619.5 -408,720 -343,720 -340.5,720 -337.57,722.93 -337.57,728.5 -336.07,730 -329.07,730 -327.57,728.5 -327.57,710.5 -326.07,709 -319.07,709 -317.57,710.5 -317.57,728.5 -316.07,730 -309.07,730 -307.57,728.5 -307.57,710.5 -306.07,709 -299.07,709 -297.57,710.5 -297.57,728.5 -296.07,730 -289.07,730 -287.57,728.5 -287.57,710.5 -286.07,709 -279.07,709 -277.57,710.5 -277.57,728.5 -276.07,730 -269.07,730 -267.57,728.5 -267.57,710.5 -266.07,709 -259.07,709 -257.57,710.5 -257.57,728.5 -256.07,730 -249.07,730 -247.57,728.5 -247.57,710.5 -246.07,709 -239.07,709 -237.57,710.5 -237.57,728.5 -236.07,730 -229.07,730 -227.57,728.5 -227.57,710.5 -226.07,709 -219.07,709 -217.57,710.5 -217.57,728.5 -216.07,730 -209.07,730 -207.57,728.5 -207.57,710.5 -206.07,709 -199.07,709 -197.57,710.5 -197.57,728.5 -196.07,730 -189.07,730 -187.57,728.5 -187.57,710.5 -186.07,709 -179.07,709 -177.57,710.5 -177.57,728.5 -176.07,730 -169.07,730 -167.57,728.5 -167.57,711.21 -166.07,709.71 -159.07,709.71 -157.57,711.21 -157.57,722.93 -156.07,724.43 -149.07,724.43 -147.57,722.93 -144.64,720 -96,720 -49,720 45.75,625.25 45.75,268.18 v1(62.75,251.18)
UHSIF_DATA20: U1.M19 U24.66 | length 1508.1
  Top w4.2: U24.66@-574.2,569.4 -574,569.2 -542.2,569.2 v1(-542,569) ; U1.M19@47,266.93 v1(62.75,282.68)
  Layer 1 w5: v1(-542,569) -527,584 -527,632 -420,739 -37,739 62.75,639.25 62.75,454 62.75,451.5 65.68,448.57 91.25,448.57 92.75,447.07 92.75,440.07 91.25,438.57 56.25,438.57 54.75,437.07 54.75,430.07 56.25,428.57 91.25,428.57 92.75,427.07 92.75,420.07 91.25,418.57 56.25,418.57 54.75,417.07 54.75,410.07 56.25,408.57 91.25,408.57 92.75,407.07 92.75,400.07 91.25,398.57 56.25,398.57 54.75,397.07 54.75,390.07 56.25,388.57 91.25,388.57 92.75,387.07 92.75,380.07 91.25,378.57 56.25,378.57 54.75,377.07 54.75,370.07 56.25,368.57 91.25,368.57 92.75,367.07 92.75,360.07 91.25,358.57 59.58,358.57 58.08,357.07 58.08,350.07 59.58,348.57 59.82,348.57 62.75,345.64 62.75,331 v1(62.75,282.68)
UHSIF_DATA21: U1.B19 U24.67 | length 1525.4
  Top w4.2: U24.67@-605.7,600.8 -603.85,602.65 -603.85,618.15 -586,636 -543,636 -457.5,550.5 -456.01,549.01 -452.54,549.01 -441.11,560.44 -439.16,560.44 -434.6,555.89 -434.6,553.94 -460.94,527.6 -460.94,525.65 -456.38,521.1 -454.43,521.1 -428.1,547.43 -426.15,547.43 -421.59,542.88 -421.59,540.93 -447.93,514.59 -447.93,512.64 -443.37,508.09 -441.42,508.09 -415.09,534.42 -413.14,534.42 -408.58,529.87 -408.58,527.91 -434.91,501.58 -434.91,499.63 -430.36,495.08 -428.41,495.08 -402.08,521.41 -400.12,521.41 -395.57,516.86 -395.57,514.9 -421.9,488.57 -421.9,486.62 -417.35,482.07 -415.4,482.07 -389.07,508.4 -387.11,508.4 -382.56,503.84 -382.56,501.89 -408.89,475.56 -408.89,473.61 -404.34,469.05 -402.39,469.05 -376.05,495.39 -374.1,495.39 -369.55,490.83 -369.55,488.88 -395.88,462.55 -395.88,460.6 -391.33,456.04 -389.38,456.04 -363.04,482.38 -361.09,482.38 -356.54,477.82 -356.54,475.87 -382.58,449.83 -382.58,447.88 -378.03,443.32 -376.08,443.32 -364.94,454.46 -361.46,454.46 -349.5,442.5 -328.8,421.8 -326.7,419.7 -309.04,419.7 -307.66,418.32 -307.66,411.88 -309.04,410.5 -346.62,410.5 -348,409.12 -348,402.68 -346.62,401.3 -309.04,401.3 -307.66,399.92 -307.66,393.48 -309.04,392.1 -346.62,392.1 -348,390.72 -348,384.28 -346.62,382.9 -309.04,382.9 -307.66,381.52 -307.66,375.08 -309.04,373.7 -346.62,373.7 -348,372.32 -348,365.88 -346.62,364.5 -309.04,364.5 -307.66,363.12 -307.66,356.68 -309.04,355.3 -346.62,355.3 -348,353.92 -348,347.48 -346.62,346.1 -309.04,346.1 -307.66,344.72 -307.66,338.28 -309.04,336.9 -346.62,336.9 -348,335.52 -348,329.08 -346.62,327.7 -309.04,327.7 -307.66,326.32 -307.66,319.88 -309.04,318.5 -315.54,318.5 -318,316.04 -318,310 -318,295.81 -304.07,281.89 -282.92,281.89 U1.B19@-267.96,266.93
UHSIF_DATA22: U1.A20 U24.68 | length 1524.7
  Top w4.2: U24.68@-621.4,600.8 -621.4,621.6 -594,649 -477,649 -436,608 -434.51,606.51 -431.04,606.51 -419.61,617.94 -417.66,617.94 -413.1,613.39 -413.1,611.44 -439.44,585.1 -439.44,583.15 -434.88,578.6 -432.93,578.6 -406.6,604.93 -404.65,604.93 -400.09,600.38 -400.09,598.43 -426.43,572.09 -426.43,570.14 -421.87,565.59 -419.92,565.59 -393.59,591.92 -391.64,591.92 -387.08,587.37 -387.08,585.41 -413.41,559.08 -413.41,557.13 -408.86,552.58 -406.91,552.58 -380.58,578.91 -378.62,578.91 -374.07,574.36 -374.07,572.4 -400.4,546.07 -400.4,544.12 -395.85,539.57 -393.9,539.57 -367.57,565.9 -365.61,565.9 -361.06,561.34 -361.06,559.39 -387.39,533.06 -387.39,531.11 -382.84,526.55 -380.89,526.55 -354.55,552.89 -352.6,552.89 -348.05,548.33 -348.05,546.38 -374.38,520.05 -374.38,518.1 -369.83,513.54 -367.88,513.54 -341.54,539.88 -339.59,539.88 -335.04,535.32 -335.04,533.37 -361.37,507.04 -361.37,505.09 -356.82,500.53 -354.87,500.53 -328.53,526.87 -326.58,526.87 -322.03,522.31 -322.03,520.36 -348.36,494.03 -348.36,492.08 -343.81,487.52 -341.86,487.52 -323.18,506.2 -321.23,506.2 -316.67,501.65 -316.67,499.7 -320.44,495.92 -320.44,492.44 -307.5,479.5 -299.46,471.46 -299.46,454 -299.46,451.9 -297,449.44 -280.84,449.44 -279.46,448.06 -279.46,441.62 -280.84,440.24 -318.08,440.24 -319.46,438.86 -319.46,432.42 -318.08,431.04 -280.84,431.04 -279.46,429.66 -279.46,423.22 -280.84,421.84 -298.08,421.84 -299.46,420.46 -299.46,414.02 -298.08,412.64 -280.84,412.64 -279.46,411.26 -279.46,404.82 -280.84,403.44 -298.08,403.44 -299.46,402.06 -299.46,395.62 -298.08,394.24 -280.84,394.24 -279.46,392.86 -279.46,386.42 -280.84,385.04 -298.08,385.04 -299.46,383.66 -299.46,377.22 -298.08,375.84 -280.84,375.84 -279.46,374.46 -279.46,368.02 -280.84,366.64 -298.08,366.64 -299.46,365.26 -299.46,358.82 -298.08,357.44 -280.84,357.44 -279.46,356.06 -279.46,349.62 -280.84,348.24 -298.08,348.24 -299.46,346.86 -299.46,340.42 -298.08,339.04 -280.84,339.04 -279.46,337.66 -279.46,331.22 -280.84,329.84 -297,329.84 -299.46,327.38 -299.46,315 U1.A20@-299.46,298.43
UHSIF_DATA23: U1.B20 U24.69 | length 1525
  Top w4.2: U24.69@-637.2,600.8 -637.2,628.8 -603,663 -425,663 -364.5,602.5 -356.51,594.51 -356.51,591.03 -366.87,580.67 -366.87,578.72 -362.32,574.16 -360.36,574.16 -339.02,595.51 -337.07,595.51 -332.52,590.95 -332.52,589 -353.86,567.66 -353.86,565.71 -349.31,561.15 -347.35,561.15 -326.01,582.5 -324.06,582.5 -319.51,577.94 -319.51,575.99 -340.85,554.65 -340.85,552.7 -336.3,548.14 -334.34,548.14 -313,569.49 -311.05,569.49 -306.49,564.93 -306.49,562.98 -327.84,541.64 -327.84,539.68 -323.28,535.13 -321.33,535.13 -299.99,556.47 -298.04,556.47 -293.48,551.92 -293.48,549.97 -314.83,528.63 -314.83,526.67 -310.27,522.12 -308.32,522.12 -287.25,543.2 -285.29,543.2 -280.74,538.64 -280.74,536.69 -300.26,517.17 -300.26,515.22 -295.7,510.67 -293.75,510.67 -284.95,519.47 -281.47,519.47 -277.5,515.5 -267.96,505.96 -267.96,503.86 -265.5,501.4 -249.34,501.4 -247.96,500.02 -247.96,493.58 -249.34,492.2 -286.58,492.2 -287.96,490.82 -287.96,484.38 -286.58,483 -249.34,483 -247.96,481.62 -247.96,475.18 -249.34,473.8 -286.58,473.8 -287.96,472.42 -287.96,465.98 -286.58,464.6 -249.34,464.6 -247.96,463.22 -247.96,456.78 -249.34,455.4 -269.88,455.4 -271.26,454.02 -271.26,447.58 -269.88,446.2 -249.34,446.2 -247.96,444.82 -247.96,438.38 -249.34,437 -269.88,437 -271.26,435.62 -271.26,429.18 -269.88,427.8 -249.34,427.8 -247.96,426.42 -247.96,419.98 -249.34,418.6 -269.88,418.6 -271.26,417.22 -271.26,410.78 -269.88,409.4 -249.34,409.4 -247.96,408.02 -247.96,401.58 -249.34,400.2 -269.88,400.2 -271.26,398.82 -271.26,392.38 -269.88,391 -249.34,391 -247.96,389.62 -247.96,383.18 -249.34,381.8 -269.88,381.8 -271.26,380.42 -271.26,373.98 -269.88,372.6 -249.34,372.6 -247.96,371.22 -247.96,364.78 -249.34,363.4 -269.88,363.4 -271.26,362.02 -271.26,355.58 -269.88,354.2 -249.34,354.2 -247.96,352.82 -247.96,346.38 -249.34,345 -269.88,345 -271.26,343.62 -271.26,337.18 -269.88,335.8 -249.34,335.8 -247.96,334.42 -247.96,327.98 -249.34,326.6 -271.3,326.6 -272.68,325.22 -272.68,318.78 -271.3,317.4 -270.42,317.4 -267.96,314.94 -267.96,312 U1.B20@-267.96,298.43
UHSIF_DATA24: U1.C20 U24.70 | length 1524.7
  Top w4.2: U24.70@-652.9,600.8 -652.9,642.1 -617,678 -408,678 -392,662 -390.51,660.51 -387.04,660.51 -377.55,670 -375.6,670 -371.04,665.45 -371.04,663.5 -391.5,643.04 -391.5,641.09 -386.94,636.54 -384.99,636.54 -364.54,656.99 -362.59,656.99 -358.03,652.44 -358.03,650.48 -378.48,630.03 -378.48,628.08 -373.93,623.53 -371.98,623.53 -351.53,643.98 -349.58,643.98 -345.02,639.43 -345.02,637.47 -365.47,617.02 -365.47,615.07 -360.92,610.52 -358.97,610.52 -338.52,630.97 -336.57,630.97 -332.01,626.41 -332.01,624.46 -345.32,611.15 -345.32,609.2 -340.77,604.65 -338.82,604.65 -325.51,617.96 -323.55,617.96 -319,613.4 -319,611.45 -329.23,601.22 -329.23,599.27 -324.68,594.71 -322.73,594.71 -312.5,604.95 -310.54,604.95 -305.99,600.39 -305.99,598.44 -316.22,588.21 -316.22,586.26 -311.67,581.7 -309.72,581.7 -299.48,591.94 -297.53,591.94 -292.98,587.38 -292.98,585.43 -303.21,575.2 -303.21,573.25 -298.66,568.69 -296.71,568.69 -286.47,578.93 -284.52,578.93 -279.97,574.37 -279.97,572.42 -290.2,562.19 -290.2,560.24 -285.65,555.68 -283.7,555.68 -273.46,565.91 -271.51,565.91 -266.96,561.36 -266.96,559.41 -277.46,548.91 -277.46,546.96 -272.9,542.4 -270.95,542.4 -266.31,547.04 -264.36,547.04 -259.81,542.49 -259.81,540.54 -263.43,536.91 -263.43,533.43 -255.5,525.5 -243,513 -236.46,506.46 -236.46,495 -236.46,492.9 -234,490.44 -217.84,490.44 -216.46,489.06 -216.46,482.62 -217.84,481.24 -238.38,481.24 -239.76,479.86 -239.76,473.42 -238.38,472.04 -217.84,472.04 -216.46,470.66 -216.46,464.22 -217.84,462.84 -238.38,462.84 -239.76,461.46 -239.76,455.02 -238.38,453.64 -217.84,453.64 -216.46,452.26 -216.46,445.82 -217.84,444.44 -238.38,444.44 -239.76,443.06 -239.76,436.62 -238.38,435.24 -217.84,435.24 -216.46,433.86 -216.46,427.42 -217.84,426.04 -238.38,426.04 -239.76,424.66 -239.76,418.22 -238.38,416.84 -217.84,416.84 -216.46,415.46 -216.46,409.02 -217.84,407.64 -238.38,407.64 -239.76,406.26 -239.76,399.82 -238.38,398.44 -217.84,398.44 -216.46,397.06 -216.46,390.62 -217.84,389.24 -238.38,389.24 -239.76,387.86 -239.76,381.42 -238.38,380.04 -217.84,380.04 -216.46,378.66 -216.46,372.22 -217.84,370.84 -238.38,370.84 -239.76,369.46 -239.76,363.02 -238.38,361.64 -217.84,361.64 -216.46,360.26 -216.46,353.82 -217.84,352.44 -238.38,352.44 -239.76,351.06 -239.76,344.62 -238.38,343.24 -217.84,343.24 -216.46,341.86 -216.46,335.42 -217.84,334.04 -234,334.04 -236.46,331.58 -236.46,316 U1.C20@-236.46,298.43
UHSIF_DATA25: U1.D20 U24.71 | length 1524.7
  Top w4.2: U24.71@-668.7,600.8 -668.7,654.3 -631,692 -386,692 -270.5,576.5 -269.01,575.01 -265.54,575.01 -257.55,583 -255.6,583 -251.04,578.45 -251.04,576.5 -259.81,567.73 -259.81,565.78 -255.25,561.23 -253.3,561.23 -244.54,569.99 -242.59,569.99 -238.03,565.44 -238.03,563.48 -252.66,548.86 -252.66,546.91 -248.1,542.36 -246.15,542.36 -231.53,556.98 -229.58,556.98 -225.02,552.43 -225.02,550.47 -245.97,529.52 -245.97,527.57 -241.42,523.02 -239.47,523.02 -224.19,538.3 -222.23,538.3 -217.68,533.75 -217.68,531.79 -220,529.48 -220,526 -211,517 -204.97,510.97 -204.97,501 -204.97,498.9 -202.51,496.44 -176.35,496.44 -174.97,495.06 -174.97,488.62 -176.35,487.24 -206.88,487.24 -208.26,485.86 -208.26,479.42 -206.88,478.04 -176.35,478.04 -174.97,476.66 -174.97,470.22 -176.35,468.84 -206.88,468.84 -208.26,467.46 -208.26,461.02 -206.88,459.64 -176.35,459.64 -174.97,458.26 -174.97,451.82 -176.35,450.44 -206.88,450.44 -208.26,449.06 -208.26,442.62 -206.88,441.24 -176.35,441.24 -174.97,439.86 -174.97,433.42 -176.35,432.04 -206.88,432.04 -208.26,430.66 -208.26,424.22 -206.88,422.84 -176.35,422.84 -174.97,421.46 -174.97,415.02 -176.35,413.64 -206.88,413.64 -208.26,412.26 -208.26,405.82 -206.88,404.44 -176.35,404.44 -174.97,403.06 -174.97,396.62 -176.35,395.24 -206.88,395.24 -208.26,393.86 -208.26,387.42 -206.88,386.04 -176.35,386.04 -174.97,384.66 -174.97,378.22 -176.35,376.84 -206.88,376.84 -208.26,375.46 -208.26,369.02 -206.88,367.64 -176.35,367.64 -174.97,366.26 -174.97,359.82 -176.35,358.44 -206.88,358.44 -208.26,357.06 -208.26,350.62 -206.88,349.24 -176.35,349.24 -174.97,347.86 -174.97,341.42 -176.35,340.04 -202.51,340.04 -204.97,337.58 -204.97,322 U1.D20@-204.97,298.43
UHSIF_DATA26: U1.F20 U24.72 | length 1524.7
  Top w4.2: U24.72@-684.4,600.8 -684.4,667.6 -645,707 -368,707 -325.5,664.5 -324.01,663.01 -320.54,663.01 -312.64,670.91 -310.69,670.91 -306.14,666.35 -306.14,664.4 -325.4,645.14 -325.4,643.19 -320.85,638.63 -318.9,638.63 -299.63,657.89 -297.68,657.89 -293.13,653.34 -293.13,651.39 -312.39,632.13 -312.39,630.18 -307.84,625.62 -305.88,625.62 -286.62,644.88 -284.67,644.88 -280.12,640.33 -280.12,638.38 -299.38,619.12 -299.38,617.17 -294.83,612.61 -292.87,612.61 -274.21,631.27 -272.26,631.27 -267.71,626.72 -267.71,624.77 -278.48,614 -278.48,612.05 -273.92,607.49 -271.97,607.49 -268.49,607.49 -262.5,601.5 -141.98,480.98 -141.98,478.88 -139.52,476.42 -128.36,476.42 -126.98,475.04 -126.98,468.6 -128.36,467.22 -155.6,467.22 -156.98,465.84 -156.98,459.4 -155.6,458.02 -128.36,458.02 -126.98,456.64 -126.98,450.2 -128.36,448.82 -155.6,448.82 -156.98,447.44 -156.98,441 -155.6,439.62 -128.36,439.62 -126.98,438.24 -126.98,431.8 -128.36,430.42 -155.6,430.42 -156.98,429.04 -156.98,422.6 -155.6,421.22 -128.36,421.22 -126.98,419.84 -126.98,413.4 -128.36,412.02 -155.6,412.02 -156.98,410.64 -156.98,404.2 -155.6,402.82 -128.36,402.82 -126.98,401.44 -126.98,395 -128.36,393.62 -155.6,393.62 -156.98,392.24 -156.98,385.8 -155.6,384.42 -128.36,384.42 -126.98,383.04 -126.98,376.6 -128.36,375.22 -155.6,375.22 -156.98,373.84 -156.98,367.4 -155.6,366.02 -128.36,366.02 -126.98,364.64 -126.98,358.2 -128.36,356.82 -155.6,356.82 -156.98,355.44 -156.98,349 -155.6,347.62 -128.36,347.62 -126.98,346.24 -126.98,339.8 -128.36,338.42 -139.52,338.42 -141.98,335.96 -141.98,328.81 U1.F20@-141.98,298.43
UHSIF_DATA27: U1.G20 U24.73 | length 1525.3
  Top w4.2: U24.73@-700.2,600.8 -700.2,676.8 -656,721 -341,721 -156.5,536.5 -155.01,535.01 -151.54,535.01 -140.11,546.44 -138.16,546.44 -133.6,541.89 -133.6,539.94 -159.94,513.6 -159.94,511.65 -155.38,507.1 -153.43,507.1 -127.1,533.43 -125.15,533.43 -120.59,528.88 -120.59,526.93 -146.93,500.59 -146.93,498.64 -142.37,494.09 -140.42,494.09 -118.4,516.1 -116.45,516.1 -111.9,511.55 -111.9,509.6 -119.01,502.49 -119.01,499.01 -115.94,495.94 -112.44,492.44 -112.44,478 -112.44,475.9 -109.98,473.44 -88.56,473.44 -87.18,472.06 -87.18,465.62 -88.56,464.24 -111.06,464.24 -112.44,462.86 -112.44,456.42 -111.06,455.04 -88.56,455.04 -87.18,453.66 -87.18,447.22 -88.56,445.84 -111.06,445.84 -112.44,444.46 -112.44,438.02 -111.06,436.64 -88.56,436.64 -87.18,435.26 -87.18,428.82 -88.56,427.44 -111.06,427.44 -112.44,426.06 -112.44,419.62 -111.06,418.24 -88.56,418.24 -87.18,416.86 -87.18,410.42 -88.56,409.04 -111.06,409.04 -112.44,407.66 -112.44,401.22 -111.06,399.84 -88.56,399.84 -87.18,398.46 -87.18,392.02 -88.56,390.64 -111.06,390.64 -112.44,389.26 -112.44,382.82 -111.06,381.44 -88.56,381.44 -87.18,380.06 -87.18,373.62 -88.56,372.24 -111.06,372.24 -112.44,370.86 -112.44,364.42 -111.06,363.04 -88.56,363.04 -87.18,361.66 -87.18,355.22 -88.56,353.84 -111.06,353.84 -112.44,352.46 -112.44,346.02 -111.06,344.64 -88.56,344.64 -87.18,343.26 -87.18,336.82 -88.56,335.44 -109.98,335.44 -112.44,332.98 -112.44,330.21 -112.44,317.81 -112.44,300.38 U1.G20@-110.48,298.43